# Altium PCB MS_PCB_New.PcbDoc (part 3 of 3)
Units mil, origin at the board's own origin, x right, y up, seen from the top; angles counter-clockwise.
Board outline 1232.38 x 1705 mil, 2 copper layers (Top Layer, Bottom Layer), stack 33 mil thick; 84 components, 60 nets, 313 pads, 105 vias.
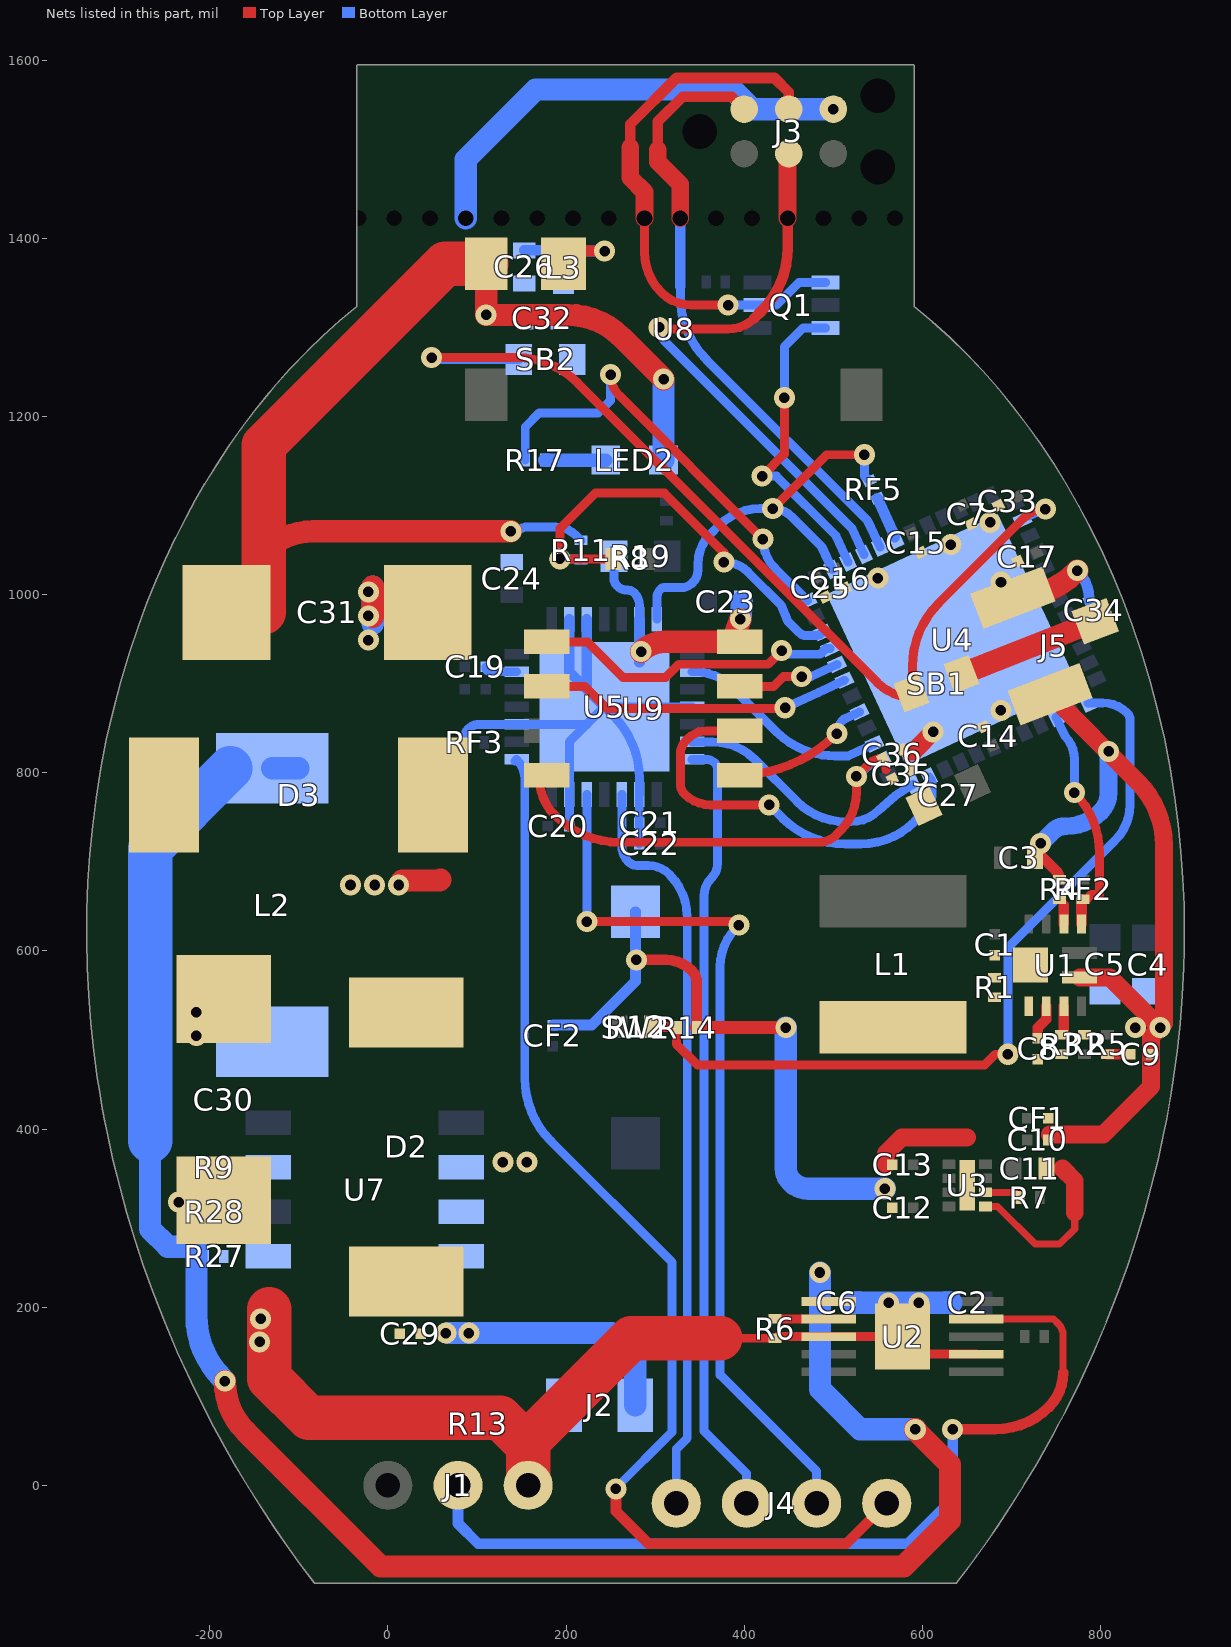
[diagram p2: the nets of this part, all layers, seen from the top]

## Via types
v1: diameter 23.62, hole 11.81, Top Layer to Bottom Layer, 70 vias
v2: diameter 23.62, hole 11.81, Top Layer to Bottom Layer, tented both sides, 35 vias

## Nets (pads, with @x,y where several pads share a name; then routed paths per layer and width w, separated by ;. In a path a pad name is that pad's centre, name@x,y a point inside that pad or via, vN(x,y) a via of type N, cw(c..) or ccw(c..) an arc to the next point about the centre after c; other vN are vias at no path point) (continued)
FB_: R2.2 R3.2 U1.3 | length 29.1
  Top Layer w12: R3.2@758.84,508.67 U1.3@758.84,537.74
FEED: SB1.1 SB2.1 U4.2 | length 1089.5
  Top Layer w10: v1(49,1266) 145,1266 cw(c145,1170.23) 212.72,1237.95 395.86,1054.81 549.75,900.92 ccw(c588.81,939.97) 588.81,884.74 588.81,919.39 cw(c688.81,919.39) 618.1,990.1 714.1,1086.1 cw(c738,1062.2) v1(738,1096)
  Bottom Layer w10: v1(49,1266) ccw(c53.83,1270.83) 53.83,1264 SB2.1@147,1264 ; U4.2@719.8,1088.22 737.91,1096.2 v1@742,1098
FEED#: C32.1 L3.2 SB2.2
FSW_: R1.2 U1.1
GND: C2.1 C3.1 C4.1 C5.1 C6.1 C7.2 C8.2 C9.1 C10.1 C11.1 C12.2 C13.2 C14.2 C15.2 C16.2 C17.2 C20.2 C21.2 C22.2 C23.1 C24.1 C25.2 C26.2 C27.2 C29.2 C30.1 C31.1 C32.2 C33.2 C34.2 C35.2 C36.2 CF1.2 CF2.2 D3.1 J1.3 J2.2 J3.6 J5.2 J5.3 LED2.1 pad.NC@87.34,1422.5 R3.1 R4.1 R6.1 R11.1 R13.1 R14.1 R19.1 R28.1 RF3.1 SW2.2 U1.5 U2.3 U2.7 U2.11 U3.5 U3.9 U4.49 U5.3 U5.9 U5.10 U5.13 U5.18 U5.23 U5.27 U5.29 U7.4 U8.1 U9.4 | length 6076.6
  Top Layer w8: U3.9@650.41,336.87 653.8,336.87 U3.9@653.8,319.35 ; U3.5@670.84,313.49 U3.5@671.08,313.25 684.43,313.25 726.68,271 754,271 771,288 771,306
  Top Layer w10: 373.17,165.17 R6.1@434.74,165.17 ; R6.1@437.57,167 U2.3@495.06,167 U2.11@577.74,167 597.43,147.31 U2.7@660.42,147.31
  Top Layer w12: v1(279,590) 312.03,590 cw(c312.03,549.03) 341,578 cw(c327.56,564.56) 346.57,564.56 R14.1@346.57,514 ; 650,391 650.41,390.59 ; C3.1@726.65,704.5 ccw(c711.87,719.28) 732.77,719.28 v1(732.77,720.62) ; C3.1@731.15,709 749.53,690.61 cw(c738.74,679.83) R4.1@754,679.83
  Top Layer w15: R14.1@346.57,514 v1(446.65,514)
  Top Layer w20: 558.93,359.75 558.93,372.7 576.82,390.59 650,390.59 ; 586.56,823.56 ccw(c586.56,830.8) 591.68,825.68 v1(612,846) ; 743,394 803,394 856.81,447.81 C9.1@856.81,484 856.81,504.03 v2(866.78,514) ; J5.3@743.2,888.3 841.85,789.64 cw(c771.14,718.93) 871.14,718.93 871.14,518.36 v2(866.78,514) ; 757.25,355.75 771,342 771,306 ; U1.5@776.56,570.22 810.56,570.22 v2(866.78,514)
  Top Layer w25: -139.26,1048 cw(c-83.73,992.47) -83.73,1071 v1(138,1071) ; U8.1@110.37,1371.43 v2(110.37,1314) 201.98,1314 cw(c201.98,1228.68) 262.31,1289.01 v1(309.48,1241.84) ; v1(284.24,936) cw(c310.8,909.44) 310.8,947 386,947 v1(395.77,972.43) ; J5.2@701.58,996.72 702.3,996.72 ccw(c702.3,1096.72) 773.01,1026.01 v1(774,1027)
  Top Layer w50: C31.1@-139.26,980 -139.26,1048 -139.26,1167.74 64.43,1371.43 U8.1@110.37,1371.43 ; -133,198 -133,120 -89,76 126,76 157.48,44.52 ; J1.3@157.48,0 157.48,44.52 ; 373.17,165.17 273.17,165.17 157.48,49.48 157.48,44.52
  Bottom Layer w10: RF3.1@86.35,834 86.35,840.18 cw(c98.82,840.18) 90,849 cw(c102.83,836.17) 102.83,854.31 U5.3@144.57,854.31 U5.29@223.32,854.31 ; v1@143,1069.94 cw(c157.63,1055.31) 157.48,1076 cw(c157.63,1055.31) 157.63,1076 188,1076 cw(c188,1043.25) 211.16,1066.41 R11.1@216.74,1060.83 ; C20.2@203.31,740 203.63,740.32 U5.27@203.63,775.57 203.63,834.63 U5.29@223.32,854.31 ; R19.1@253.74,1043 253.74,1017.87 ccw(c264.87,1017.87) 257,1010 257.05,1009.95 ccw(c269,1021.9) 269,1005 cw(c269,994.14) 276.68,1001.82 cw(c262.95,988.09) 282.37,988.09 U5.13@282.37,972.43 ; C22.2@282.19,720 C21.2@282.19,744 282.19,775.39 U5.23@282.37,775.57 282.37,793.21 ccw(c182.37,793.21) 253.08,863.92 U5.29@243,874 ; U5.18@341.43,874 U5.29@243,874 ; U5.29@223.32,854.31 U5.29@243,874
  Bottom Layer w12: CF2.2@186,516.81 228.81,516.81 278,566 SW2.2@278,643.92 ; U5.9@203.63,972.43 203.63,913.37 U5.29@223.32,893.68 ; U5.10@223.32,972.43 U5.29@223.32,893.68 ; U5.29@243,874 U5.29@223.32,893.68 ; U5.29@282.37,924 U5.13@282.37,972.43 ; v1(774,1027) cw(c741.86,994.86) 787.31,994.86 C34.2@787.31,993.08
  Bottom Layer w20: v1(732.77,720.62) 746.59,734.45 cw(c760,721.04) 760,740 761.37,740 ccw(c761.37,794.63) 800,756 ccw(c778.27,777.73) 809,777.73 v1(809,824)
  Bottom Layer w25: pad.NC@87.34,1422.5 87.34,1488.34 166,1567 387,1567 409,1545 v2(500,1545) ; LED2.1@309.48,1151 v1(309.48,1241.84) ; v1(395.77,972.43) C23.1@397.5,992 ; v1(446.65,514) 446.65,356.34 ccw(c468.34,356.34) 453,341 ccw(c472.31,360.31) 472.31,333 v1(558,333) ; C6.1@522.5,205 v2(562,205) v2(596,205) C2.1@632.5,205
  other v1: 688,870 688.26,1014 550,1018.41 632,1056 676,1081
  other v2: -144,161 -143,187 -235,318 839.11,514
GPIO17: U4.23 U9.2 | length 466.6
  Top Layer w10: U9.2@395,847 358,847 ccw(c358,817.19) 336.92,838.27 334.65,836 ccw(c350.03,820.62) 328.28,820.62 328.28,787.39 ccw(c344.39,787.39) 333,776 ccw(c361.97,804.97) 361.97,764 v1(428,764)
  Bottom Layer w10: v1(428,764) 442.71,749.29 ccw(c513.42,820) 513.42,720 530.64,720 ccw(c530.64,805.36) 591,745 601.65,755.65 ccw(c579.09,778.22) 611,778.22 611,786.7 ccw(c598.77,786.7) U4.23@607.42,795.34
ILIM_: R4.2 U1.8 | length 21.1
  Top Layer w12: U1.8@758.84,630.26 758.84,651.33
IN: C30.2 D2.2 R9.2 U7.2 | length 29
  Bottom Layer w10: v2@-215,502 v2(-215,531)
  other v2: 129,363 156,363 -215,505
IN#: R9.1 U7.7
IO_0: Q1.3 U4.39 | length 353.5
  Top Layer w10: v1(420,1133) 445,1158 v1(445,1221)
  Bottom Layer w10: v1(420,1133) 436.05,1133 503,1066.05 U4.39@516.61,1036.66 ; v1(445,1221) 445,1278 466.41,1299.41 Q1.3@491.19,1299.41
ISET_: R6.2 U2.2 | length 60.4
  Top Layer w10: R6.2@434.74,186.83 494.92,186.83 U2.2@495.06,186.69
LED_PIN_: R17.1 U4.36 | length 516.5
  Top Layer w10: v1(250,1247) ccw(c283.07,1247) 259.69,1223.61 v1(421,1062.3)
  Bottom Layer w10: R17.1@154.17,1151 154.17,1188.17 170,1204 236,1204 250,1218 v1(250,1247) ; v1(421,1062.3) ccw(c467.11,1062.3) 434.51,1029.69 U4.36@471.12,993.08
NetC9_2: C9.2 R5.2 | length 25.4
  Top Layer w12: R5.2@808,484.17 C9.2@833.36,484.17
NetC26_1: C26.1 L3.1 U8.2 | length 141.7
  Top Layer w12: U8.2@196.98,1371.43 211.26,1385.7 v1(243.3,1385.7)
  Bottom Layer w12: C26.1@153,1386.5 L3.1@196.2,1386.5 ; L3.1@197,1385.7 v1(243.3,1385.7)
NetJ5_1: J5.1 SB1.2 | length 161.3
  Top Layer w25: SB1.2@644.01,910.75 J5.1@794,970
NetLED2_2: LED2.2 R17.2 | length 68.7
  Bottom Layer w15: R17.2@175.83,1151 LED2.2@244.52,1151
NetR7_1: R7.1 U3.6 | length 41.3
  Top Layer w8: U3.6@671.08,329 703.91,329 R7.1@709.91,323
OA1#: J4.1 U5.24 | length 850.7
  Bottom Layer w10: U5.24@262.69,775.57 262.69,717.66 ccw(c287.66,717.66) 270,700 ccw(c279.66,709.66) 279.66,696 291.86,696 cw(c291.86,661.86) 315.98,686.02 cw(c267.72,637.72) 336,637.72 336,52.96 323.74,40.7 J4.1@323.74,-20
  Bottom Layer w12: J4.1@323.74,-20 J4.1@328.69,-15.06
OA2#: J4.2 U5.21 | length 882.1
  Bottom Layer w10: U5.21@341.43,814.94 357.48,814.94 cw(c357.48,801.48) 367,811 cw(c359.76,803.76) 370,803.76 370,698.09 cw(c347.29,698.09) 363.35,682.03 ccw(c383.5,661.88) 355,661.88 355,61 402.48,13.52 J4.2@402.48,-20
OB1#: J4.3 U5.26 | length 1022.2
  Top Layer w10: v1(223.31,633) 384.34,633 cw(c384.34,619.34) v1(394,629)
  Bottom Layer w10: v1(223.31,633) v1@223.31,640.24 ; U5.26@223.31,775.57 v1@223.31,640.24 ; v1@226.31,633 cw(c233.56,640.24) v1@223.31,640.24 ; v1(394,629) 391.38,626.38 ccw(c435.77,582) 373,582 373,124 481.22,15.78 J4.3@481.22,-20
OB2#: J4.4 U5.1 | length 1277.1
  Top Layer w12: v1(256,-4) 256,-29 292.5,-65.5 514.46,-65.5 J4.4@559.96,-20
  Bottom Layer w10: U5.1@142.58,812.95 U5.1@144.57,814.94 cw(c122.66,793.03) 153.65,793.03 153.65,457.33 ccw(c253.65,457.33) 182.94,386.62 319,250.56 319,60 v1@255.5,-3.5
PWR_EN: RF2.2 U1.7 U4.15 | length 259.4
  Top Layer w10: v1(770.68,777.76) cw(c702.77,709.85) 798.81,709.85 798.81,663.51 789.67,663.51 784.33,658.17 RF2.2@780.53,658.17
  Top Layer w12: U1.7@778.53,630.26 RF2.2@778.53,658.17
  Bottom Layer w10: U4.15@750.14,861.9 760,841 cw(c734.21,815.21) 770.68,815.21 v1(770.68,777.76)
RTS: J3.4 pad.NC@288.12,1422.5 Q1.1 Q1.5 | length 630.7
  Top Layer w10: pad.NC@288.12,1422.5 288.12,1384.57 ccw(c352.57,1384.57) 307,1339 ccw(c340.8,1372.8) 340.8,1325 v1(382,1325)
  Top Layer w12: 272,1502 272,1528 324,1580 434,1580 450,1564 J3.4@450,1545
  Top Layer w20: 272,1502 272,1468 288.12,1451.88 pad.NC@288.12,1422.5
  Bottom Layer w10: v1@376.91,1322.2 379.71,1325 Q1.5@414.81,1325 436,1325 461.59,1350.59 Q1.1@491.19,1350.59
RXD: J3.3 pad.NC@448.75,1422.5 U4.40 | length 653.9
  Top Layer w10: v1(304.4,1300) ccw(c309.23,1304.83) 309.23,1298 381.62,1298 ccw(c381.62,1339.96) 411.29,1310.29
  Top Layer w12: 411.29,1310.29 419.46,1318.46 ccw(c348.75,1389.17) 448.75,1389.17 pad.NC@448.75,1422.5 ; J3.3@448.75,1493.75 J3.3@450,1495
  Top Layer w20: pad.NC@448.75,1422.5 J3.3@448.75,1493.75
  Bottom Layer w10: v1(304.4,1300) ccw(c326.6,1300) 310.91,1284.3 520.84,1074.37 U4.40@534.45,1044.98
SCLK: U4.31 U9.6 | length 360.5
  Top Layer w10: U9.6@169.46,897 U9.6@178.46,897 221,897 245.78,872.22 444.12,872.22 ccw(c444.12,874.88) v1(446,873)
  Bottom Layer w10: v1(446,873) 483.33,890.27 U4.31@512.72,903.88
SD0: U4.32 U9.3 | length 115.4
  Top Layer w10: U9.3@386,897 U9.3@395,897 433,897 444,908 v1(464.44,908)
  Bottom Layer w10: v1@475.01,908.11 U4.32@504.4,921.72
SD1: U4.33 U9.5 | length 360.1
  Top Layer w10: U9.5@169.46,947 U9.5@178.46,947 224,947 264.1,906.9 311.58,906.9 326.46,921.78 426.74,921.78 v1@441.96,937 ; v1(442,937) v1@447,937
  Bottom Layer w10: v1@447,937 451,933 485.36,933 491.92,939.56 U4.33@496.08,939.56
SD3: U4.29 U9.1 | length 168.3
  Top Layer w10: U9.1@386,797 390.53,797 ccw(c390.53,957.47) v1(504,844)
  Bottom Layer w10: v1(504,844) cw(c523.77,844) 509.79,857.98 511.94,860.13 U4.29@529.36,868.19
STDBY: U4.24 U5.20 | length 292.3
  Bottom Layer w10: U5.20@341.43,834.63 364.41,834.63 cw(c364.41,767.12) 412.14,814.86 459.22,767.78 ccw(c514.21,822.77) 514.21,745 519.62,745 ccw(c519.62,789.38) 551,758 569.13,774 U4.24@589.58,787.02
STEP_: U4.27 U5.16 | length 240.2
  Bottom Layer w10: U5.16@341.43,913.37 344.77,913.37 cw(c344.77,855.77) 385.5,896.5 435.59,846.41 ccw(c502,912.82) 487.2,820.08 ccw(c502,912.82) 502,818.9 516.61,818.9 U4.27@545.99,832.51
SW_: C1.1 L1.2 R1.1 U1.11
TEMP_A: R8.2 R11.2 U4.34 | length 512.4
  Top Layer w10: R8.2@253.24,1040 v1(193,1040) 193,1074 233,1114 310.43,1114 377.23,1047.2 v1(377.23,1036.55)
  Bottom Layer w10: v1@186,1040 v1(193,1040) 214.74,1040 cw(c214.74,1037.18) R11.2@216.74,1039.17 ; v1(377.23,1036.55) cw(c377.23,998.49) 404.15,1025.4 441.54,988.01 449,970 461.74,957.26 ccw(c469.41,964.94) 469.41,954.08 479.76,954.08 ccw(c479.76,965.4) U4.34@487.76,957.4
TEMP_B: R12.2 R14.2 U4.13 | length 919
  Top Layer w10: R14.2@323.91,515 323.91,495.33 347.24,472 670,472 682,484 v1(696,484)
  Top Layer w12: R12.2@296.74,515 R14.2@323.91,515
  Bottom Layer w10: v1(696,484) 696,603.74 816.55,724.29 ccw(c776.85,764) 833,764 833,859.76 ccw(c822.76,859.76) 830,867 ccw(c802.15,839.15) 802.15,878.54 U4.13@785.83,878.54
TMC_TX: RF5.1 U4.42 | length 47.8
  Bottom Layer w12: RF5.1@549.58,1108.19 U4.42@569.13,1064.62
TS_: J1.2 U2.9 | length 1014.5
  Top Layer w8: U2.9@660.42,186.68 747.32,186.68 752.5,181.5 cw(c739.22,168.22) 758,168.22 758,126.56
  Top Layer w12: v2(634,63) 681.57,63 ccw(c681.57,148.53) 742.05,88.05 ccw(c703.54,126.56) 758,126.56
  Bottom Layer w12: J1.2@78.74,0 78.74,-42.74 101.5,-65.5 583.5,-65.5 634,-15 v2(634,63)
TXD: J3.2 pad.NC@328.28,1422.5 U4.41 | length 688.4
  Top Layer w12: 303,1499 303,1531 331,1559 386,1559 J3.2@400,1545
  Top Layer w20: 303,1499 303,1486 328.28,1460.72 pad.NC@328.28,1422.5
  Bottom Layer w10: 328.28,1346 328.28,1334.51 ccw(c428.28,1334.51) 357.57,1263.8 538.68,1082.69 U4.41@552.29,1053.3
  Bottom Layer w12: 328.28,1346 pad.NC@328.28,1422.5
UART_IO_: RF5.2 U4.38 U5.14 | length 468.8
  Top Layer w10: v1(432,1096.58) 492.42,1157 v1(535,1157)
  Bottom Layer w10: U5.14@302.06,972.43 302.06,996.48 cw(c315.52,996.48) 306,1006 cw(c310.83,1001.17) 310.83,1008 330,1008 ccw(c330,1023.83) 341.19,1012.64 342.66,1014.1 ccw(c329.76,1027) 348,1027 348,1034.33 cw(c395.49,1034.33) 361.91,1067.91 371,1077 cw(c418.27,1029.73) 418.27,1096.58 v1(432,1096.58) cw(c432,1067.25) 452.74,1087.99 487.02,1053.71 U4.38@498.77,1028.34 ; v1(535,1157) 535,1133.24 RF5.2@539.13,1129.1
V_CHG: C6.2 C31.2 L2.1 R27.2 U2.1 | length 2192
  Top Layer w25: v2(-183,117) ccw(c-103.33,117) -159.67,60.67 -8,-91 579,-91 631,-39 631,23.13 592,62.13 v2(592,63) ; v2@-17,975 v2@-17,1009
  Bottom Layer w25: -267,387 -267,288 -247,268 -215,268 -215,190.42 ccw(c-115,190.42) -185.71,119.71 v2(-183,117) ; L2.1@-129.74,805.09 L2.1@-100.33,805.09 ; v2@-17,967.41 v2@-17,1009 ; v2(485,239) 485,108 530,63 v2(592,63)
  Bottom Layer w50: -267,387 -267,715 L2.1@-176.91,805.09
  other v2: -22,949 -22,976 -22,1003
VA: R27.1 R28.2 U7.5
VCC: C8.1 U1.2 | length 39.9
  Top Layer w12: C8.1@729.65,501.81 729.65,513.65 739.16,523.16 U1.2@739.16,537.74
VCP_: C19.2 U5.6 | length 38
  Bottom Layer w10: C19.2@109.81,919 ccw(c115.44,919) 115.44,913.37 U5.6@144.57,913.37
VDDSDIO: C35.1 C36.1 U4.26 U9.8 | length 531.6
  Top Layer w10: U9.8@169.46,797 ccw(c235.77,797) 182.32,757.77 188.79,751.29 ccw(c259.51,822) 259.51,722 484,722 ccw(c484,748.56) 502.78,729.78 508,735 ccw(c464.54,778.46) 526,778.46 v1(526,795.83) 539.57,809.4 cw(c555.52,793.45) C36.1@554.17,815.97 ; C36.1@554.17,816.01 cw(c541.94,803.78) C36.1@554.21,815.97 ; 559.24,803.78 ccw(c541.94,803.78) C36.1@554.21,815.97
  Bottom Layer w10: v1(526,795.83) 539.95,808.02 U4.26@554.31,814.67
W_OUT: D3.2 L2.2 U7.3 | length 43.3
  Top Layer w25: v2@16,679 56.59,679 ccw(c56.59,682.41) 59,680
  other v2: -42,674 -15,674 12,674
W_Pad1: C29.1 D2.1 J2.1 | length 295.2
  Top Layer w20: D2.1@36.81,214.07 D2.1@51.74,229
  Bottom Layer w25: v2@69,171 251,171 277.74,144.26 J2.1@277.74,90
  other v2: 65,171 91,171
pads on no net: J3.MP5 J3.MP6 J3.MP7 U2.4 U2.5 U2.6 U3.3 U4.5 U4.6 U4.7 U4.8 U4.10 U4.11 U4.12 U4.14 U4.16 U4.18 U4.20 U4.28 U4.35 U4.44 U4.45 U4.47 U4.48 U5.7 U5.11 U5.12 U5.17 U5.25 U7.1 U7.6 U7.8 U8.3 U8.4

## Other copper
Top Layer:
  rectangle net GND: -280,366 -197,477
  region net GND: -166.74,417.62 -302.64,370.83 -221.46,135.08 -85.57,181.87
  rectangle net RXD: 434.63,1408 462.63,1435
  rectangle net 2.5V: 279,1019 327,1055
  rectangle net IN: 95,341 170,380
  rectangle net GND: 719,692 746,734
  region net 3V3: 631.49,1147.68 559.13,1113.94 575.63,1078.54 648,1112.29
  rectangle net GND: 71,1342 104,1435
  region net 3V3: 691.6,842.75 617.74,808.31 644.36,751.23 718.21,785.66
  region net GND: 649.17,1005.62 666.14,978.46 727.77,1016.96 710.79,1044.12
  region net GND: 652.08,1076.13 483.1,997.34 494.61,972.67 663.58,1051.46
  region net GND: 697.25,1089.38 690.26,1104.38 646.35,1083.9 653.34,1068.9
  region net 3V3: 655.92,1095.83 647.92,1112.98 469.01,1029.55 477.01,1012.4
  region net GND: 688.71,1076.58 680.19,1094.85 480.96,1001.94 489.47,983.68
  region net GND: 710.29,1047.41 694.88,1040.22 715.59,995.82 731,1003
  region net GND: 649.85,868.61 663.31,839.73 734.33,872.85 720.87,901.73
  region net GND: 584.56,840.83 564.96,831.69 605.77,744.16 625.38,753.3
  region net VDDSDIO: 559.4,829.03 541.55,820.71 561.15,778.68 579,787
  rectangle net GND: 644,355 657,390.59
  rectangle net BAT: 710.91,373 724,418
  rectangle net GND: 739,343 764,483
  rectangle net GND: 846,474 880,531
  rectangle net BAT: 669.5,674 702,723
  rectangle net SW_: 485,487 650.41,581
  rectangle net BAT: 484,650 728,685
  rectangle net 3V3: 604,341 635,371
  rectangle net BOOT_: 669,613.52 725,640.52
  rectangle net FSW_: 669,526 725,553
  rectangle net GND: 723,470 764,489
  rectangle net FB_: 748,497 790,511
  rectangle net SW_: 485,565 742,603
  rectangle net DTR: 474.79,1408 502.79,1435
  rectangle net 3V3: 394.47,1408 422.47,1435
  rectangle net TXD: 314.16,1408 342.16,1435
  rectangle net RTS: 274,1408 302,1435
  rectangle net 3V3: 581,295 609,371
  rectangle net GND: 543,243 574,371
  rectangle net V_CHG: -61,910 94,1051
  rectangle net W_OUT: -61,643.45 94,893
  rectangle net GND: -299,359.75 -246,656
  rectangle net IN: -68.26,341 111,511
  rectangle net W_Pad1: 29,139 112,211
  rectangle net GND: -299,642 -146,865
  rectangle net GND: -207,159 -80,251
  rectangle net GND: -220,138 19,179
  rectangle net 3V3: 586.58,305 629.74,317.25
  rectangle net GND: 647,308 670.08,317.25
  rectangle net BAT: 666,341 717.38,366
  rectangle net BAT: 666,343 724,400
  rectangle net GND: 731,343 751,424
  rectangle net GND: 543,112 616,252
  rectangle net BAT: 629.35,202 691.35,252
  rectangle net V_CHG: 464,202 526,252
  rectangle net GND: -235,642 -110,1051
  rectangle net GND: -238,194 -80,477
  rectangle net W_Pad1: -68.26,189 112,331
  rectangle net IN: -238,490 111,628
Bottom Layer:
  rectangle net NetLED2_2: 168.07,1135 256,1167
  rectangle net GND: 509,184 646,223
  rectangle net GND: 123,1027 154,1073
  rectangle net GND: 123,1059 235,1086
  rectangle net V_CHG: -198,756 2,1033
  rectangle net W_OUT: -193,521 -89,696
  rectangle net 8V: 298,707 354,790
  rectangle net 8V: 164.65,729 188,790.6
  rectangle net GND: 208,1051 269,1069
  rectangle net 2.5V: 285,1021 334,1089
  region net GND: 101.46,1435 73.46,1435 73.46,1408 101.46,1408
  region net GND: 883.78,572 777.78,572 777.78,500 883.78,500
  rectangle net 8V: 788,594 884,655
  rectangle net GND: 94,1288 171,1361
  rectangle net FEED#: 181,1240 229,1360
  region net RTS: 302.25,1435 274.25,1435 274.25,1408 302.25,1408
  region net TXD: 342.4,1435 314.4,1435 314.4,1408 342.4,1408
  region net 3V3: 422.72,1435 394.72,1435 394.72,1408 422.72,1408
  region net RXD: 462.88,1435 434.88,1435 434.88,1408 462.88,1408
  region net DTR: 503.03,1435 475.03,1435 475.03,1408 503.03,1408
  rectangle net IN: 54,343 169,380
  rectangle net GND: -167,146 27,200
  rectangle net GND: -88,146 27,282
  rectangle net GND: -47,242 108,282
  rectangle net V_CHG: -229,251 -199.35,284
  region net IN: -199.35,547 -232,547 -232,351 -199.35,351
  rectangle net IN#: -193,343 -108,374
  rectangle net GND: -248,297 -200,332
  rectangle net VA: -193,243 -108,274
  rectangle net VA: -193,246 -166,332
  rectangle net W_OUT: -28,293 108,330
  rectangle net GND: 126,-32 189,66
  rectangle net GND: 104,40.7 218,123
  rectangle net ADC_BAT: 47,41 94,82
  rectangle net BAT: -16,42 37,82
  region net W_OUT: 35,696 -89,696 -89,293 35,293
  rectangle net VCP_: 103,909 123,929

## Silkscreen, mask and mechanical layers (free items; w line width, h text height)
Top Overlay:
  lines w3.94: -331.56,519.3 -331.55,519.33 ; -319.13,426.86 -319.12,426.89 ; -306.64,869.51 -306.63,869.53 ; -173.97,1169.77 -173.95,1169.78 ; -104.36,-77.03 -104.36,-77 ; -33.14,1361.58 -33.16,1361.57 589,1361.57 589.02,1361.58 ; 589,1411.71 589.02,1411.72 -33.14,1411.72 ; 637.07,-108.03 -81.22,-108 ; 749.77,66.82 749.77,66.83 ; 847.08,306.42 847.07,306.43 ; 874.89,426.32 874.88,426.33 ; 875.16,426.89 875.17,426.86 ; 887.6,519.3 887.59,519.33 ; 890.86,676.81 890.87,676.79 ; -335.56,581.45 ccw(c783.15,622.37) -324.1,457.47 ; -335.56,581.47 ccw(c783.15,622.38) -324.09,457.49 ; -335.56,581.45 cw(c731.84,620.89) -325.6,771.68 ; -335.56,581.47 cw(c731.84,620.9) -325.59,771.69 ; -335.56,581.45 -335.55,581.48 ; -335.55,581.48 ccw(c783.15,622.38) -324.09,457.5 ; -335.55,581.48 cw(c731.84,620.91) -325.58,771.7 ; -325.6,771.68 cw(c662.4,631.04) -278.03,964.96 ; -325.59,771.69 cw(c662.4,631.05) -278.02,964.98 ; -325.6,771.68 -325.58,771.7 ; -325.58,771.7 cw(c662.4,631.05) -278.01,964.99 ; -324.1,457.47 ccw(c813.41,626.54) -313.33,396.4 ; -324.1,457.47 -324.09,457.5 ; -324.09,457.5 ccw(c813.4,626.54) -313.32,396.43 ; -324.09,457.49 ccw(c813.41,626.54) -313.33,396.41 ; -313.33,396.4 ccw(c858.72,636.68) -262.22,218.44 ; -313.33,396.41 ccw(c858.71,636.69) -262.22,218.46 ; -313.33,396.4 -313.32,396.43 ; -313.32,396.43 ccw(c858.71,636.69) -262.22,218.47 ; -278.03,964.96 cw(c556.7,669.88) -180.28,1160.5 ; -278.03,964.96 -278.01,964.99 ; -278.01,964.99 cw(c556.69,669.89) -180.26,1160.52 ; -278.02,964.98 cw(c570.11,664.01) -203.7,1123.5 cw(c476.03,719.57) -127.43,1230.47 cw(c389.31,793.66) -33.15,1322.2 ; -262.22,218.44 ccw(c909.89,655.39) -202.83,83.88 ; -262.22,218.47 ccw(c909.88,655.4) -202.83,83.91 ; -262.22,218.46 ccw(c909.88,655.4) -202.83,83.9 ; -262.22,218.44 -262.22,218.47 ; -202.83,83.88 ccw(c921.96,661.24) -184.31,49.13 ; -202.83,83.91 ccw(c921.96,661.25) -184.3,49.16 ; -202.83,83.9 ccw(c921.96,661.24) -184.31,49.15 ; -202.83,83.88 -202.83,83.91 ; -184.3,49.16 ccw(c916.56,658.07) -126.49,-45.29 ; -184.31,49.13 ccw(c916.4,658.02) -126.49,-45.31 ; -184.31,49.15 ccw(c916.4,658.02) -126.49,-45.3 ; -184.31,49.13 -184.3,49.16 ; -180.28,1160.5 cw(c446.94,741.51) -97.99,1263.06 cw(c376.54,807.97) -33.16,1322.2 ; -180.26,1160.52 cw(c446.93,741.53) -97.97,1263.07 cw(c376.53,807.99) -33.14,1322.21 ; -126.49,-45.29 ccw(c873.93,629.38) -81.22,-107.99 ; -126.49,-45.31 ccw(c874.13,629.41) -81.22,-108.02 ; -126.49,-45.3 ccw(c874.13,629.42) -81.22,-108 ; -126.49,-45.31 -126.49,-45.29 ; -81.22,-107.99 637.07,-108.02 ; -81.22,-108.02 637.07,-108.02 ; -81.22,-108.02 -81.22,-107.99 ; -33.14,1322.21 -33.14,1400.95 ; -33.16,1322.2 -33.16,1400.94 ; -33.15,1322.2 -33.15,1400.94 ; -33.16,1322.2 -33.14,1322.21 ; -33.16,1322.2 589,1322.2 ; -33.16,1400.94 -33.14,1400.95 ; -33.16,1400.94 -33.16,1422.49 ; -33.14,1400.95 -33.14,1422.5 ; -33.15,1400.94 -33.15,1422.49 ; -33.16,1400.94 589,1400.94 ; -33.16,1411.71 -33.14,1411.72 ; -33.16,1422.49 589,1422.49 ; -33.14,1422.5 589.02,1422.5 ; -33.15,1422.49 589.01,1422.49 ; -33.16,1422.49 -33.14,1422.5 ; 589,1322.2 cw(c166.52,793.65) 683.29,1230.47 ; 589.01,1322.2 cw(c166.52,793.65) 683.3,1230.47 ; 589,1322.2 589,1400.94 ; 589.01,1322.2 589.01,1400.94 ; 589,1322.2 589.02,1322.21 ; 589,1400.94 589.02,1400.95 ; 589,1400.94 589,1422.49 ; 589.01,1400.94 589.01,1422.49 ; 589,1422.49 589.02,1422.5 ; 589.02,1322.21 cw(c166.51,793.65) 683.31,1230.47 ; 589.02,1322.21 589.02,1400.95 ; 589.02,1400.95 589.02,1422.5 ; 637.07,-108.02 ccw(c-318.02,629.32) 682.34,-45.32 ; 637.07,-108.02 ccw(c-318.28,629.4) 682.34,-45.31 ; 637.07,-108.02 ccw(c-318.28,629.4) 682.34,-45.32 ; 637.07,-108.02 637.07,-108.02 ; 682.34,-45.31 ccw(c-360.55,658.01) 740.16,49.13 ; 682.34,-45.32 ccw(c-360.55,658.02) 740.16,49.12 ; 682.34,-45.32 ccw(c-360.55,658.02) 740.16,49.13 ; 682.34,-45.31 682.34,-45.32 ; 683.29,1230.47 cw(c79.81,719.56) 759.55,1123.49 ; 683.31,1230.47 cw(c79.8,719.56) 759.57,1123.49 cw(c-14.27,664.01) 833.89,964.96 ; 683.3,1230.47 cw(c79.81,719.56) 759.56,1123.49 ; 740.16,49.12 ccw(c-366.12,661.25) 759.1,84.67 ; 740.16,49.12 740.16,49.13 ; 740.16,49.13 ccw(c-366.12,661.24) 759.09,84.68 ; 740.16,49.13 ccw(c-366.12,661.24) 759.1,84.68 ; 759.1,84.67 ccw(c-353.94,655.36) 818.08,218.43 ; 759.1,84.67 759.09,84.68 ; 759.09,84.68 ccw(c-353.93,655.35) 818.07,218.44 ; 759.1,84.68 ccw(c-353.94,655.35) 818.08,218.44 ; 759.55,1123.49 cw(c-14.27,664) 833.88,964.96 ; 759.56,1123.49 cw(c-14.27,664) 833.89,964.96 ; 818.07,218.44 ccw(c-302.86,636.68) 869.18,396.4 ; 818.08,218.43 ccw(c-302.87,636.69) 869.19,396.39 ; 818.08,218.44 ccw(c-302.87,636.68) 869.18,396.39 ; 818.07,218.44 818.08,218.43 ; 833.88,964.96 cw(c-106.56,631.04) 881.44,771.68 881.46,771.67 ; 833.89,964.96 cw(c-106.57,631.05) 881.46,771.67 ; 833.89,964.96 cw(c-106.56,631.04) 881.45,771.67 ; 869.18,396.4 ccw(c-257.71,626.56) 879.79,456.4 ; 869.19,396.39 ccw(c-257.71,626.57) 879.8,456.39 ; 869.18,396.39 ccw(c-257.71,626.56) 879.79,456.39 ; 869.18,396.4 869.19,396.39 ; 869.37,396.41 ccw(c-257.37,626.54) 880.14,457.49 ; 869.37,396.4 ccw(c-257.37,626.54) 880.14,457.47 ; 869.37,396.4 869.36,396.43 ccw(c-257.36,626.54) 880.13,457.5 ; 879.79,456.4 879.8,456.39 ; 880.14,457.47 ccw(c-227.11,622.37) 891.6,581.45 ; 880.14,457.47 880.13,457.5 ; 880.14,457.49 ccw(c-227.11,622.38) 891.6,581.47 ; 880.13,457.5 ccw(c-227.11,622.38) 891.59,581.48 ; 881.63,771.69 cw(c-175.8,620.9) 891.6,581.47 ; 881.62,771.7 cw(c-175.8,620.91) 891.59,581.48 ; 881.64,771.68 cw(c-175.8,620.89) 891.6,581.45 ; 881.62,771.7 881.64,771.68 ; 891.6,581.45 891.59,581.48 ; -334.83,676.79 -334.81,676.81 ; -291.23,306.43 -291.22,306.46 ; -234.51,150.29 -234.5,150.32 ; -193.71,66.44 -193.7,66.47 ; -156.45,1.29 -156.44,1.32 ; 660.21,-77.03 660.21,-77.04 ; 712.3,1.29 712.3,1.28 ; 729.82,1169.77 729.83,1169.77
  text "Breakable Part" at -30.14,1493.22 h30
  text "JTAG" at 328,1429 h50 r90
  text "#" at 763,1106 h55 r180
  text "TMP_A" at 381.74,1076 h75
  text "TMP_B" at 405,552 h75
  text "*" at 691,459 h80
  text "*" at 743,394 h80
  text "*" at 526.74,321.87 h80
Bottom Overlay:
  text "IND" at 217,1179 h80
  text "*" at 48,959 h80 r180
  text "SW" at 103.74,642.84 h80
  text "W_COIL" at 381.74,145 h80
Mechanical 1:
  circle w3.94: c140319.59,-89.37 r140240.88
  circle w3.94: c-36411.91,-89.37 r-36658.79
  circle w3.94: c-149646.74,476.31 r-149924.76
  circle w3.94: c32726.24,395.64 r32448.22
  circle w3.94: c-6020.56,631.86 r-6298.58
  circle w3.94: c70134.56,506.43 r69893.22
  lines w3.94: -76.8,-0.85 -76.8,-0.79 234.22,-0.79 234.22,-0.85 ; -33.14,1322.21 589.02,1322.21 ; -33.14,1361.58 589.02,1361.58 ; -33.14,1400.95 589.02,1400.95 ; -33.16,1411.71 589,1411.71 ; 78.71,-89.37 78.71,87.8 78.71,87.74 ; 203.22,513.83 203.22,513.72 240.62,513.72 ; 238,1165 316.74,1165 ; 240.62,513.67 315.42,513.67 ; 246.88,-0.85 246.88,-0.79 636.65,-0.79 636.65,-0.85 ; 249.11,537.39 249.11,537.45 ; 260.39,480.68 260.39,480.74 ; 277.93,-108.03 277.93,-108 ; 277.94,-89.43 277.94,-108 ; 277.92,395.72 277.92,-108.02 ; 278.02,395.61 278.02,476.32 ; 278.02,631.83 278.02,551.12 ; 295.65,480.68 295.65,480.74 ; 306.93,537.39 306.93,537.45 ; 314.7,506.37 314.7,506.43 ; 315.42,513.72 352.82,513.72 352.82,513.83 ; 441.76,-89.43 441.76,-89.37 441.76,87.8 441.76,87.74 ; -76.8,-89.43 234.22,-89.43 ; -76.8,-89.43 -76.8,87.74 ; -76.8,-89.43 -76.8,-89.37 ; -76.8,-89.37 234.22,-89.37 ; -76.8,-89.37 -76.8,87.8 ; -76.8,87.76 -76.8,-89.4 234.22,-89.4 234.22,87.76 ; -76.8,87.74 234.22,87.74 ; -76.8,87.76 234.22,87.76 ; -76.8,87.74 -76.8,87.8 ; -76.8,87.8 234.22,87.8 ; 203.22,395.61 352.82,395.61 ; 203.22,395.61 203.22,631.83 ; 203.22,395.61 203.22,395.72 ; 203.22,395.72 352.82,395.72 ; 203.22,395.72 203.22,559.73 203.22,631.94 ; 203.22,631.83 352.82,631.83 ; 203.22,631.83 203.22,631.94 ; 203.22,631.94 352.75,631.94 352.82,631.94 ; 234.22,-89.43 234.22,87.74 ; 234.22,-89.43 234.22,-89.37 ; 234.22,-89.37 234.22,87.8 ; 234.22,87.74 234.22,87.8 ; 238.55,1133.47 238.55,1133.47 ; 238.55,1133.47 317.29,1133.47 ; 238.55,1133.47 317.29,1133.47 ; 238.55,1133.47 317.29,1133.47 ; 238.55,1153.15 238.55,1153.16 ; 238.55,1153.15 317.29,1153.15 ; 246.88,-89.37 636.65,-89.37 ; 246.88,-89.37 246.88,87.8 ; 246.88,-89.37 246.88,-89.37 ; 246.88,87.74 636.65,87.74 ; 246.88,87.76 636.65,87.76 ; 246.88,87.74 246.88,-89.43 636.65,-89.43 ; 246.88,87.76 246.88,-89.4 636.65,-89.4 636.65,87.76 ; 246.88,87.74 246.88,87.79 ; 246.88,87.8 636.65,87.8 ; 246.88,87.79 246.88,87.8 ; 277.92,1133.47 277.92,1133.47 ; 277.92,1133.47 277.92,1172.84 ; 277.92,1172.84 277.92,1322.2 ; 277.92,1172.84 277.92,1172.84 ; 277.94,1322.21 277.94,1400.95 ; 277.92,1322.2 277.92,1400.94 ; 277.92,1400.94 277.92,1422.49 ; 277.94,1400.95 277.94,1422.5 ; 277.93,1422.49 277.93,1422.5 ; 278.02,476.26 ccw(c278.02,513.67) 278.02,551.07 ; 278.02,476.26 cw(c278.02,513.67) 278.02,551.07 ; 278.02,476.26 278.02,551.07 ; 278.02,476.32 ccw(c278.02,513.72) 278.02,551.12 ; 278.02,476.29 ccw(c278.02,513.69) 278.02,551.1 ; 278.02,476.32 cw(c278.02,513.72) 278.02,551.12 ; 278.02,476.29 cw(c278.02,513.69) 278.02,551.1 ; 278.02,551.07 278.02,551.12 ; 317.29,1133.47 317.29,1133.47 ; 317.29,1153.15 317.29,1153.16 ; 352.82,395.61 352.82,631.83 ; 352.82,395.61 352.82,395.72 ; 352.82,395.72 352.82,631.94 ; 352.82,631.83 352.82,631.94 ; 636.65,-89.43 636.65,87.74 ; 636.65,-89.43 636.65,-89.37 ; 636.65,-89.37 636.65,87.8 ; 636.65,-89.37 636.65,-89.37 ; 636.65,87.74 636.65,87.79 ; 636.65,87.79 636.65,87.8 ; 203.22,395.67 352.82,395.67 352.82,631.89 203.22,631.89 203.22,395.67
Mechanical 2:
  lines w3.94: -331.56,519.3 -331.55,519.33 ; -319.13,426.86 -319.12,426.89 ; -306.64,869.51 -306.63,869.53 ; -173.97,1169.77 -173.95,1169.78 ; -104.36,-77.03 -104.36,-77 ; -33.16,1361.57 -33.14,1361.58 ; 589,1361.57 589.02,1361.58 ; 589,1411.71 589.02,1411.72 ; 637.07,-108.03 -81.22,-108 ; 749.77,66.82 749.77,66.83 ; 847.08,306.42 847.07,306.43 ; 874.89,426.32 874.88,426.33 ; -335.56,581.47 ccw(c783.15,622.38) -324.09,457.49 ; -335.56,581.47 cw(c731.84,620.9) -325.59,771.69 ; -335.56,581.45 ccw(c783.15,622.37) -324.1,457.47 ; -335.56,581.45 cw(c731.84,620.89) -325.6,771.68 ; -335.56,581.45 -335.55,581.48 ; -335.55,581.48 ccw(c783.15,622.38) -324.09,457.5 ; -335.55,581.48 cw(c731.84,620.91) -325.58,771.7 ; -325.59,771.69 cw(c662.4,631.05) -278.02,964.98 ; -325.6,771.68 cw(c662.4,631.04) -278.03,964.96 ; -325.6,771.68 -325.58,771.7 ; -325.58,771.7 cw(c662.4,631.05) -278.01,964.99 ; -324.1,457.47 ccw(c813.41,626.54) -313.33,396.4 ; -324.1,457.47 -324.09,457.5 ; -324.09,457.49 ccw(c813.41,626.54) -313.33,396.41 ; -324.09,457.5 ccw(c813.4,626.54) -313.32,396.43 ; -313.33,396.41 ccw(c858.71,636.69) -262.22,218.46 ; -313.33,396.4 ccw(c858.72,636.68) -262.22,218.44 ; -313.33,396.4 -313.32,396.43 ; -313.32,396.43 ccw(c858.71,636.69) -262.22,218.47 ; -278.03,964.96 cw(c556.7,669.88) -180.28,1160.5 ; -278.03,964.96 -278.01,964.99 ; -278.02,964.98 cw(c570.11,664.01) -203.7,1123.5 cw(c476.03,719.57) -127.43,1230.47 cw(c389.31,793.66) -33.15,1322.2 ; -278.01,964.99 cw(c556.69,669.89) -180.26,1160.52 ; -262.22,218.46 ccw(c909.88,655.4) -202.83,83.9 ; -262.22,218.47 ccw(c909.88,655.4) -202.83,83.91 ; -262.22,218.44 ccw(c909.89,655.39) -202.83,83.88 ; -262.22,218.44 -262.22,218.47 ; -202.83,83.9 ccw(c921.96,661.24) -184.31,49.15 ; -202.83,83.91 ccw(c921.96,661.25) -184.3,49.16 ; -202.83,83.88 ccw(c921.96,661.24) -184.31,49.13 ; -202.83,83.88 -202.83,83.91 ; -184.31,49.15 ccw(c916.4,658.02) -126.49,-45.3 ; -184.31,49.13 ccw(c916.4,658.02) -126.49,-45.31 ; -184.3,49.16 ccw(c916.56,658.07) -126.49,-45.29 ; -184.31,49.13 -184.3,49.16 ; -180.26,1160.52 cw(c446.93,741.53) -97.97,1263.07 cw(c376.53,807.99) -33.14,1322.21 ; -180.28,1160.5 cw(c446.94,741.51) -97.99,1263.06 cw(c376.54,807.97) -33.16,1322.2 ; -126.49,-45.3 ccw(c874.13,629.42) -81.22,-108 ; -126.49,-45.31 ccw(c874.13,629.41) -81.22,-108.02 ; -126.49,-45.29 ccw(c873.93,629.38) -81.22,-107.99 ; -126.49,-45.31 -126.49,-45.29 ; -81.22,-108.02 -81.22,-107.99 ; -81.22,-108.02 637.07,-108.02 ; -81.22,-107.99 637.07,-108.02 ; -33.15,1322.2 -33.15,1400.94 ; -33.16,1322.2 -33.16,1400.94 ; -33.14,1322.21 -33.14,1400.95 ; -33.16,1322.2 -33.14,1322.21 ; -33.15,1400.94 -33.15,1422.49 ; -33.14,1400.95 -33.14,1422.5 ; -33.16,1400.94 -33.16,1422.49 ; -33.16,1400.94 -33.14,1400.95 ; -33.14,1422.5 -33.14,1593 589.02,1593 589.02,1422.5 ; -33.16,1422.49 -33.14,1422.5 ; 589.01,1322.2 cw(c166.52,793.65) 683.3,1230.47 ; 589,1322.2 cw(c166.52,793.65) 683.29,1230.47 ; 589.01,1322.2 589.01,1400.94 ; 589,1322.2 589,1400.94 ; 589,1322.2 589.02,1322.21 ; 589.01,1400.94 589.01,1422.49 ; 589,1400.94 589,1422.49 ; 589,1400.94 589.02,1400.95 ; 589,1422.49 589.02,1422.5 ; 589.02,1322.21 cw(c166.51,793.65) 683.31,1230.47 ; 589.02,1322.21 589.02,1400.95 ; 589.02,1400.95 589.02,1422.5 ; 637.07,-108.02 ccw(c-318.28,629.4) 682.34,-45.32 ; 637.07,-108.02 ccw(c-318.28,629.4) 682.34,-45.31 ; 637.07,-108.02 ccw(c-318.02,629.32) 682.34,-45.32 ; 637.07,-108.02 637.07,-108.02 ; 682.34,-45.32 ccw(c-360.55,658.02) 740.16,49.13 ; 682.34,-45.32 ccw(c-360.55,658.02) 740.16,49.12 ; 682.34,-45.31 ccw(c-360.55,658.01) 740.16,49.13 ; 682.34,-45.31 682.34,-45.32 ; 683.3,1230.47 cw(c79.81,719.56) 759.56,1123.49 ; 683.31,1230.47 cw(c79.8,719.56) 759.57,1123.49 cw(c-14.27,664.01) 833.89,964.96 ; 683.29,1230.47 cw(c79.81,719.56) 759.55,1123.49 ; 740.16,49.12 ccw(c-366.12,661.25) 759.1,84.67 ; 740.16,49.12 740.16,49.13 ; 740.16,49.13 ccw(c-366.12,661.24) 759.1,84.68 ; 740.16,49.13 ccw(c-366.12,661.24) 759.09,84.68 ; 759.1,84.67 ccw(c-353.94,655.36) 818.08,218.43 ; 759.1,84.67 759.09,84.68 ; 759.1,84.68 ccw(c-353.94,655.35) 818.08,218.44 ; 759.09,84.68 ccw(c-353.93,655.35) 818.07,218.44 ; 759.56,1123.49 cw(c-14.27,664) 833.89,964.96 ; 759.55,1123.49 cw(c-14.27,664) 833.88,964.96 ; 818.08,218.44 ccw(c-302.87,636.68) 869.18,396.39 ; 818.08,218.43 ccw(c-302.87,636.69) 869.19,396.39 ; 818.07,218.44 ccw(c-302.86,636.68) 869.18,396.4 ; 818.07,218.44 818.08,218.43 ; 833.89,964.96 cw(c-106.56,631.04) 881.45,771.67 ; 833.89,964.96 cw(c-106.57,631.05) 881.46,771.67 ; 833.88,964.96 cw(c-106.56,631.04) 881.44,771.68 ; 869.18,396.39 ccw(c-257.71,626.56) 879.79,456.39 ; 869.19,396.39 ccw(c-257.71,626.57) 879.8,456.39 ; 869.18,396.4 ccw(c-257.71,626.56) 879.79,456.4 ; 869.18,396.4 869.19,396.39 ; 879.79,456.4 ccw(c-227.5,622.38) 891.41,581.45 ; 879.8,456.39 ccw(c-227.5,622.39) 891.42,581.45 ; 879.79,456.39 ccw(c-227.5,622.39) 891.42,581.45 ; 879.79,456.4 879.8,456.39 ; 881.46,771.67 cw(c-176,620.9) 891.42,581.45 ; 881.45,771.67 cw(c-176,620.9) 891.42,581.45 ; 881.46,771.67 881.44,771.68 ; 881.44,771.68 cw(c-176,620.89) 891.41,581.45 ; 891.41,581.45 891.42,581.45 ; -334.83,676.79 -334.81,676.81 ; -291.23,306.43 -291.22,306.46 ; -234.51,150.29 -234.5,150.32 ; -193.71,66.44 -193.7,66.47 ; -156.45,1.29 -156.44,1.32 ; -33.16,1411.71 -33.14,1411.72 ; 660.21,-77.03 660.21,-77.04 ; 712.3,1.29 712.3,1.28 ; 729.82,1169.77 729.83,1169.77 ; 887.35,518.76 887.37,518.76 ; 890.68,676.79 890.69,676.78

## Dimensions
-33.14,1422.5 to -33,1595 on Mechanical 1
-33.14,1422.5 to -81.22,-107.99 on Mechanical 1
-336.29,620.89 to 892.15,620.9 on Mechanical 1
-33.15,1400.94 to 589.01,1400.94 on Mechanical 1
-33.15,1322.2 to -81.22,-108 on Mechanical 1
277.93,1422.5 to 352.82,631.83 on Mechanical 1
316.74,1165 to -33.16,1422.49 on Mechanical 1